# Altium PCB board.PcbDoc
Units mil, origin at the board's own origin, x right, y up, seen from the top; angles counter-clockwise.
Board outline 3543.31 x 2559.06 mil, 4 copper layers (Top Layer, GND, Signal, Bottom Layer), stack 62.337 mil thick; 95 components, 46 nets, 229 pads, 107 vias.
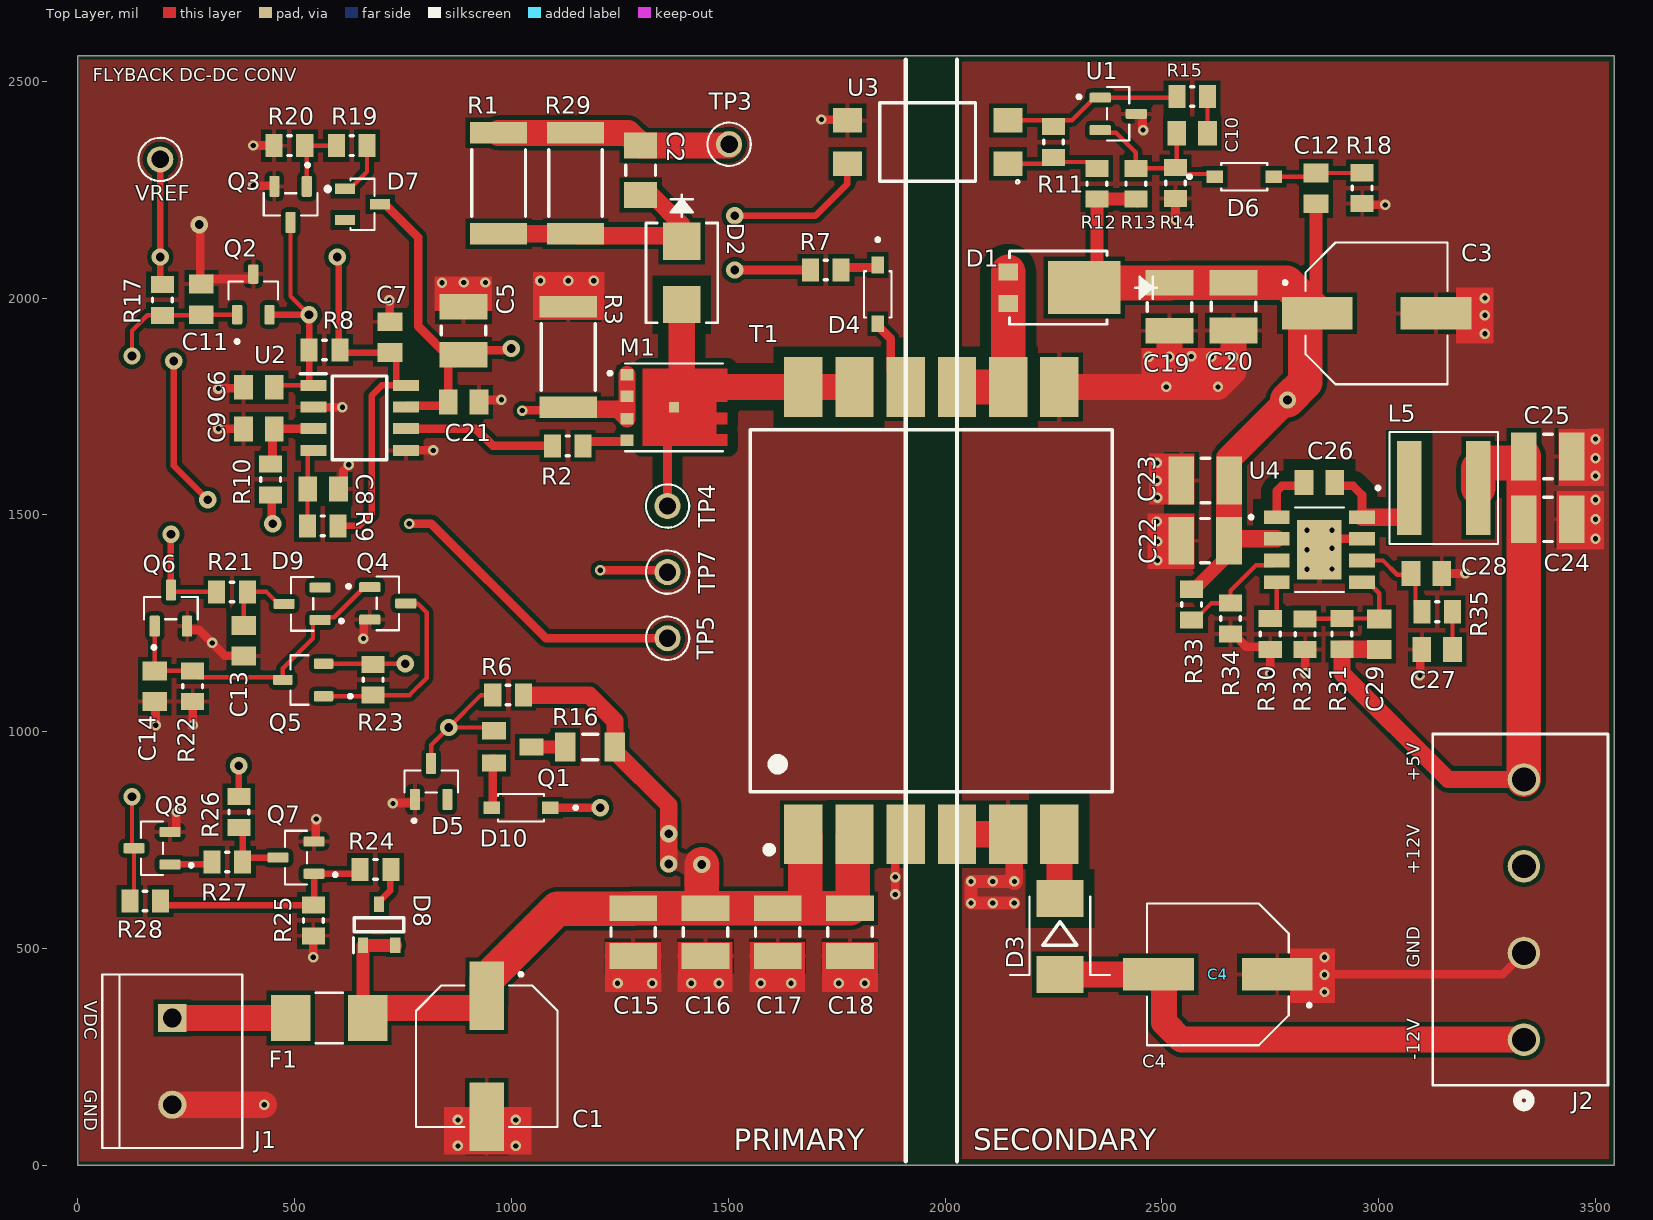
[diagram p0: Top Layer view]
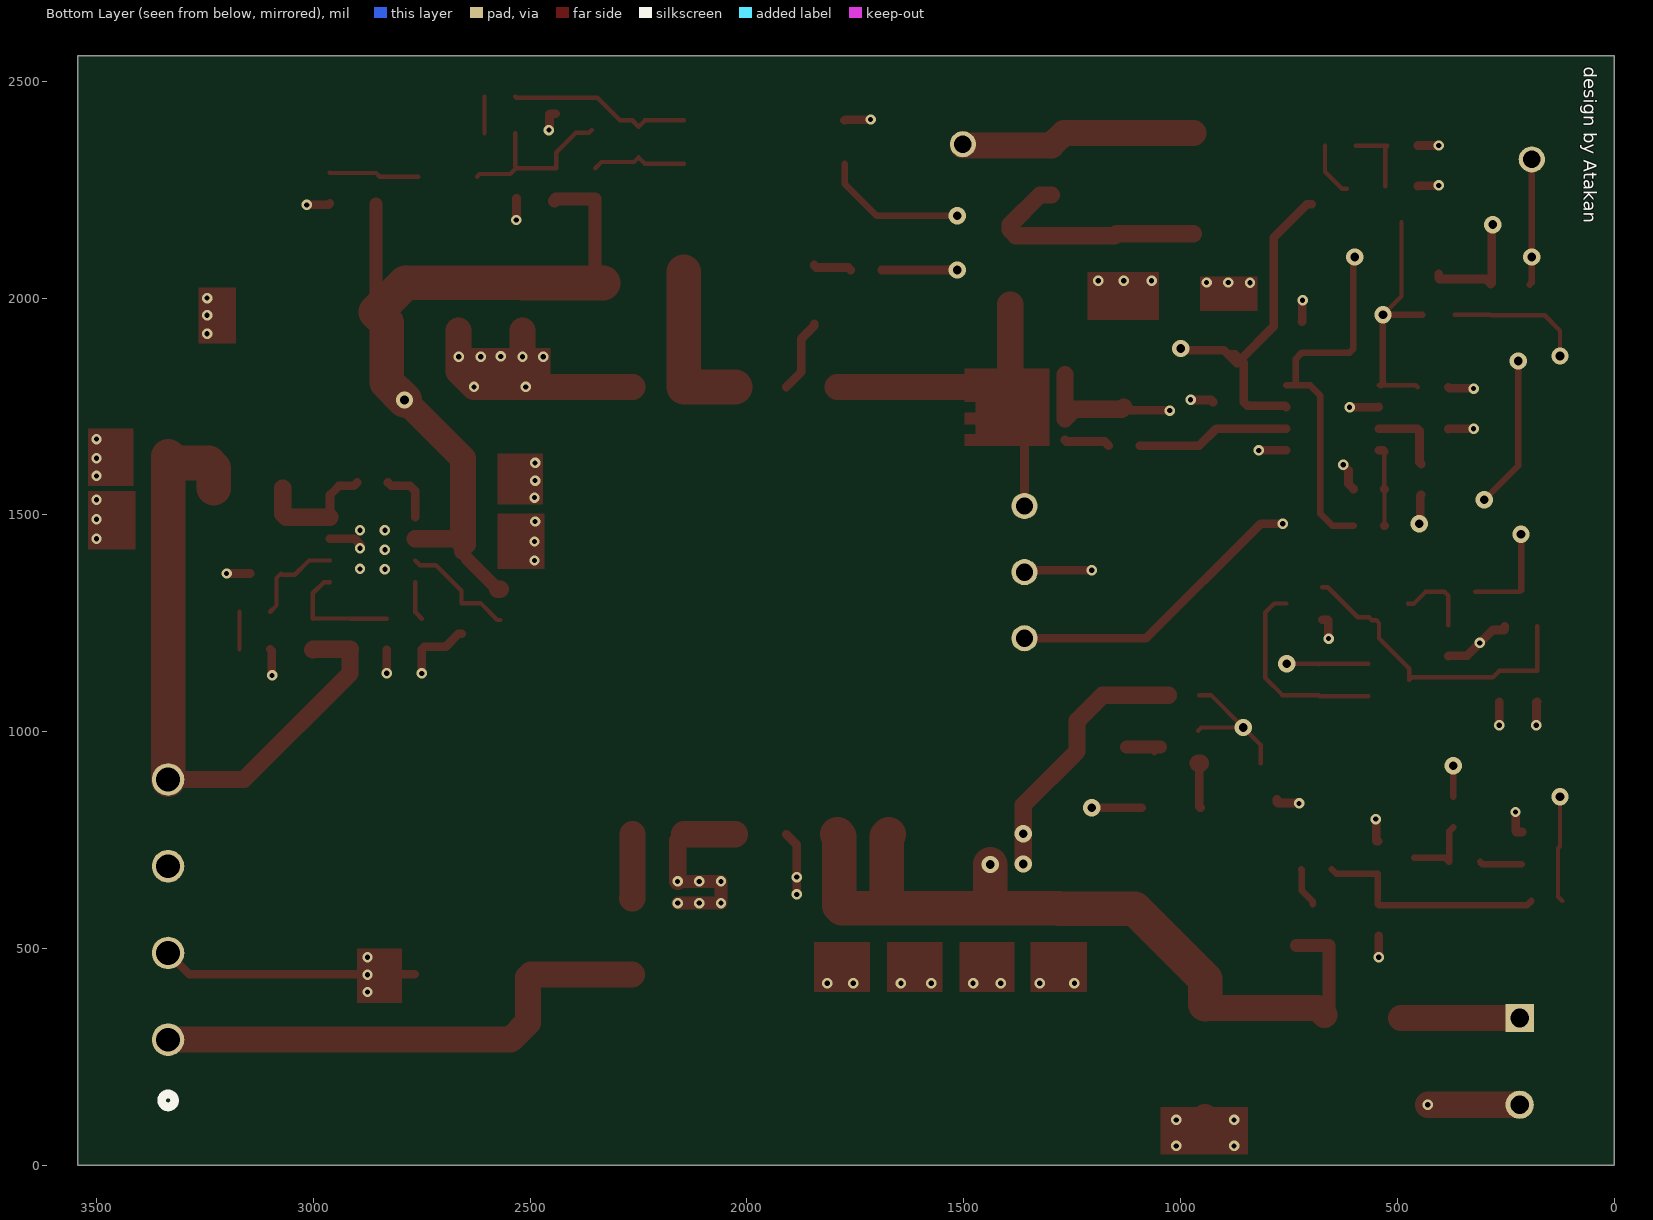
[diagram p1: Bottom Layer view, seen from below]
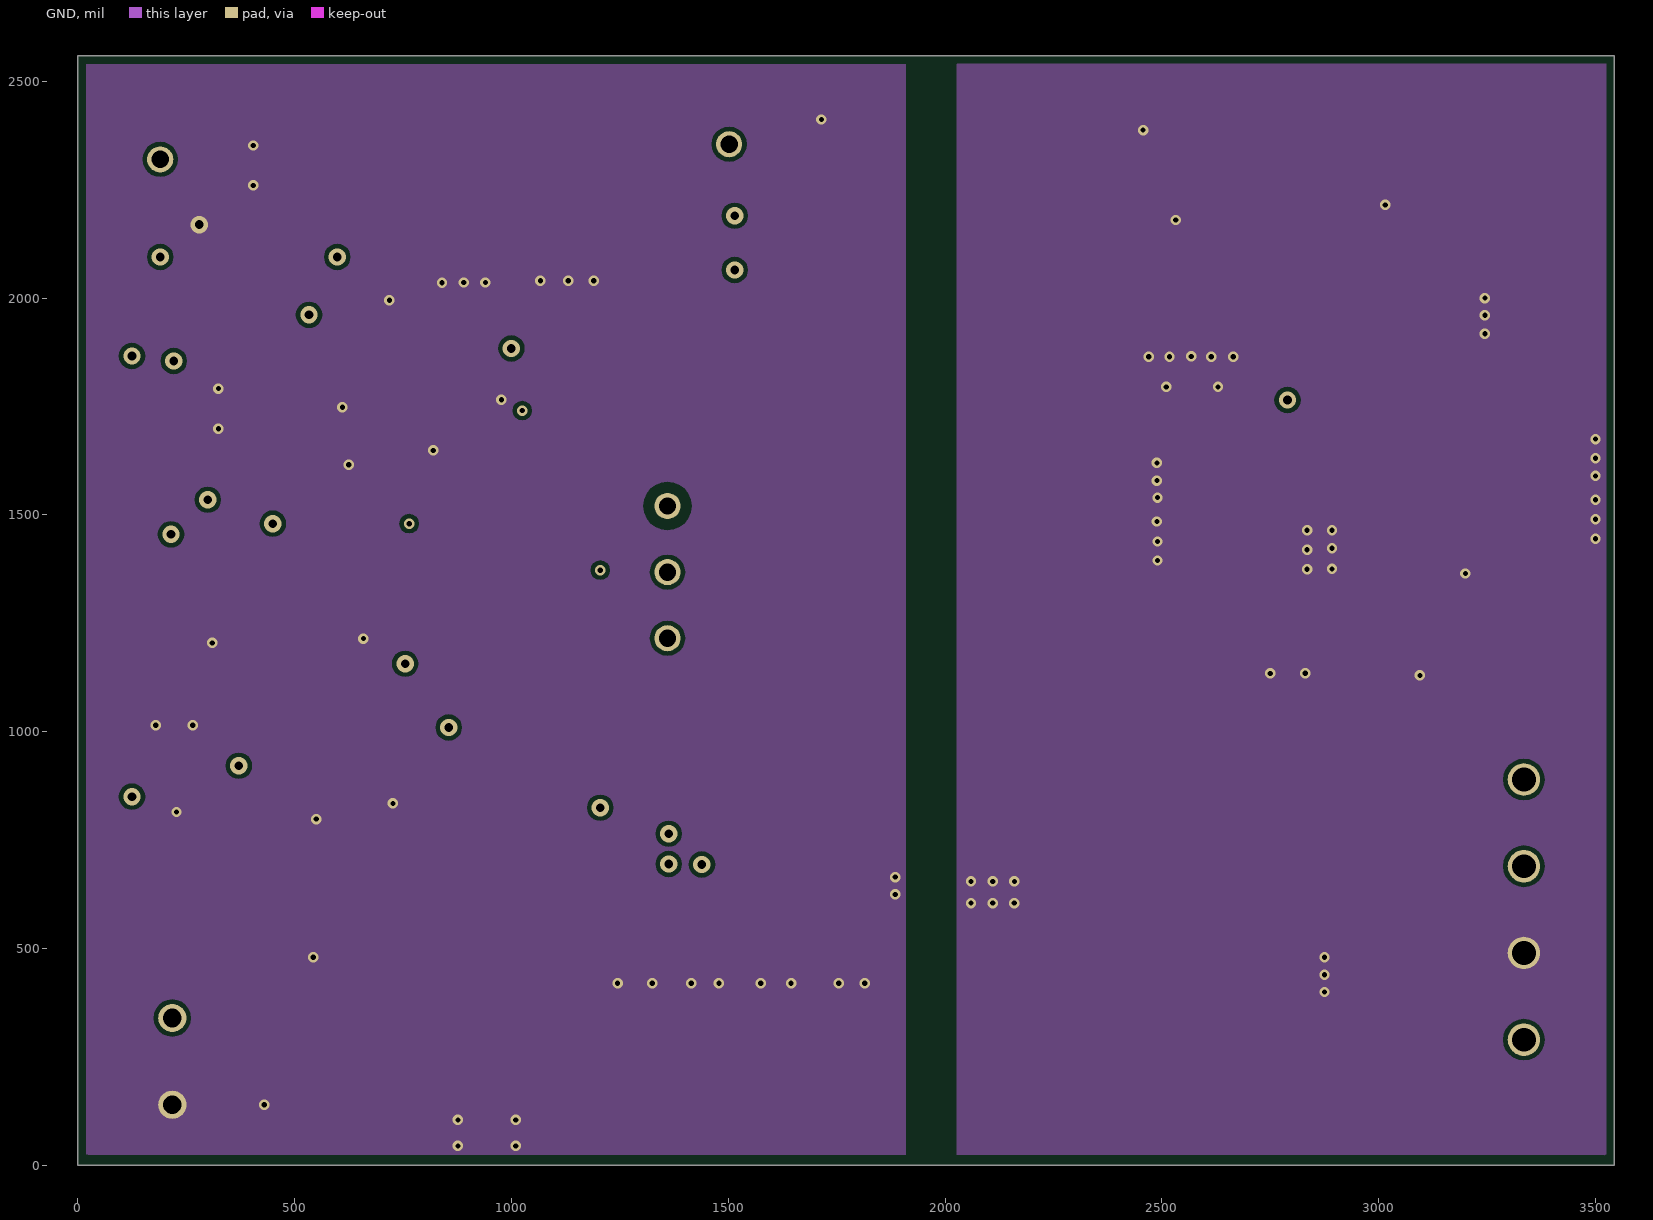
[diagram p2: GND]
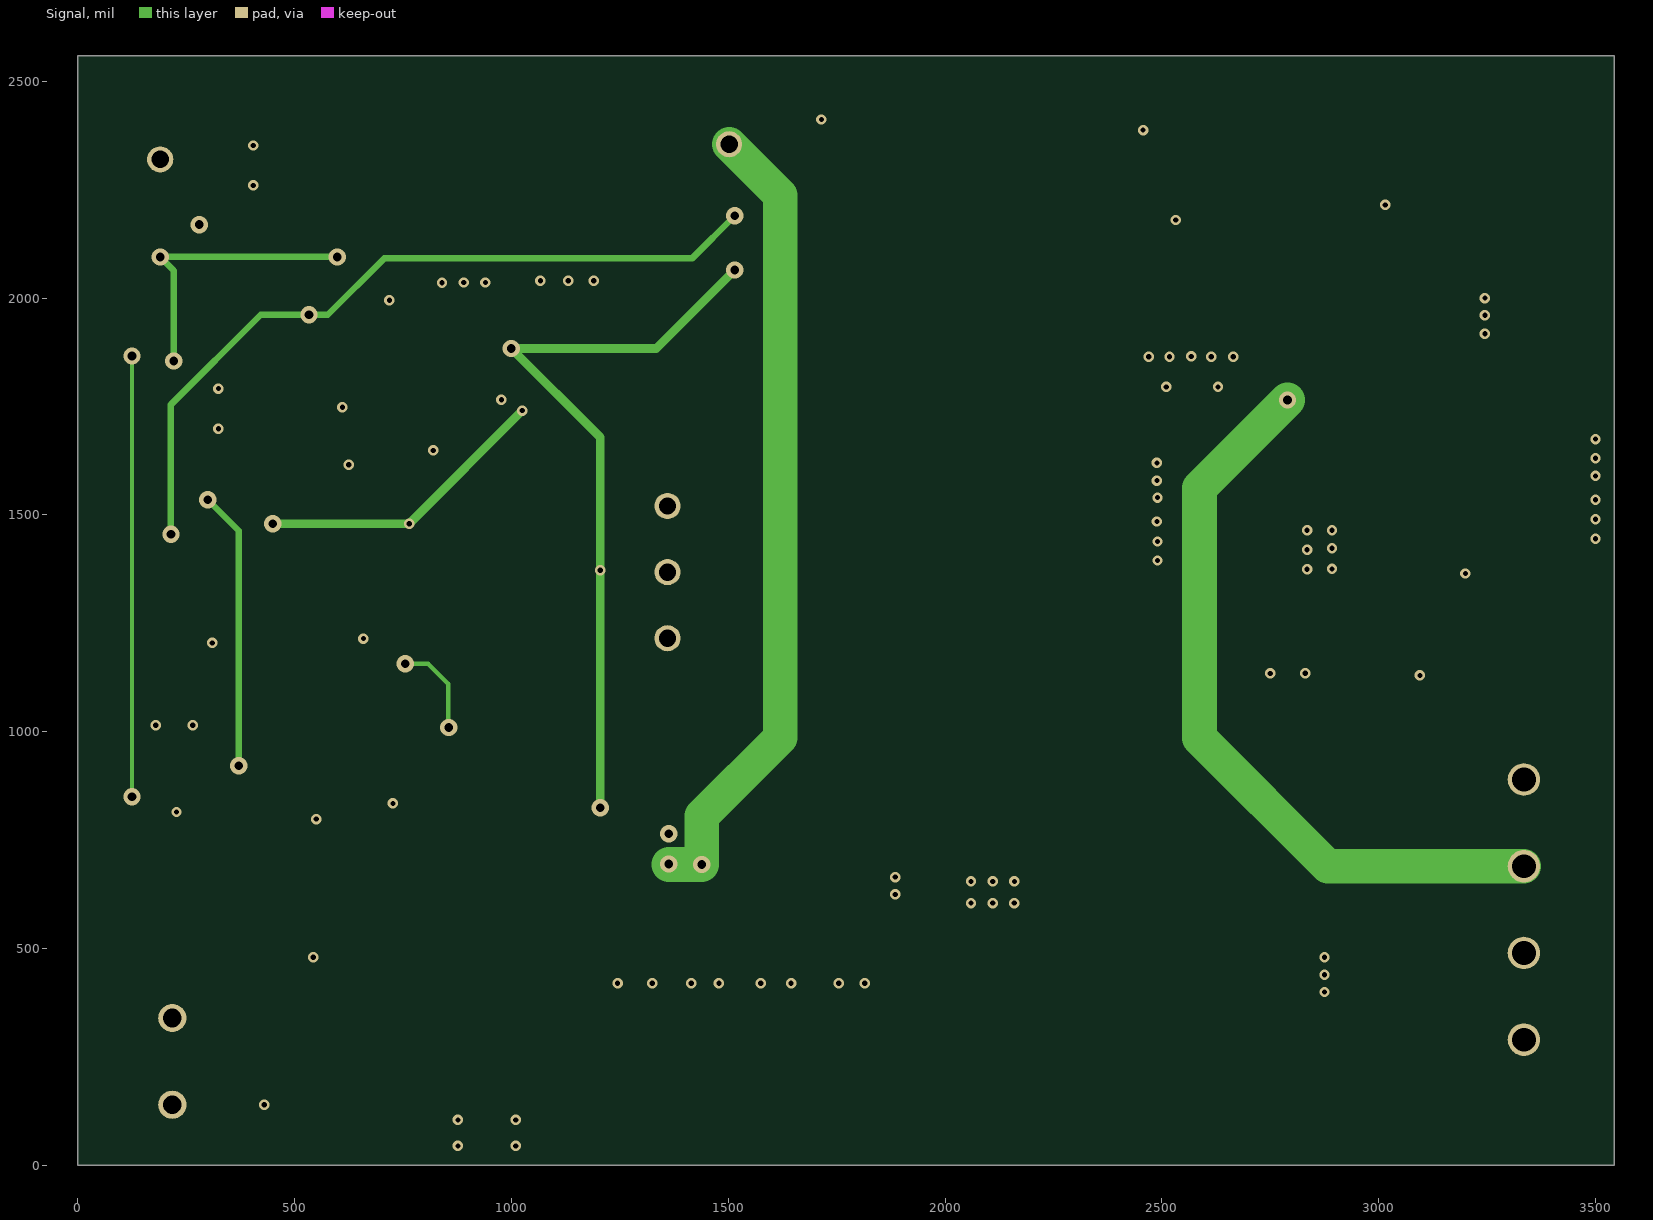
[diagram p3: Signal]
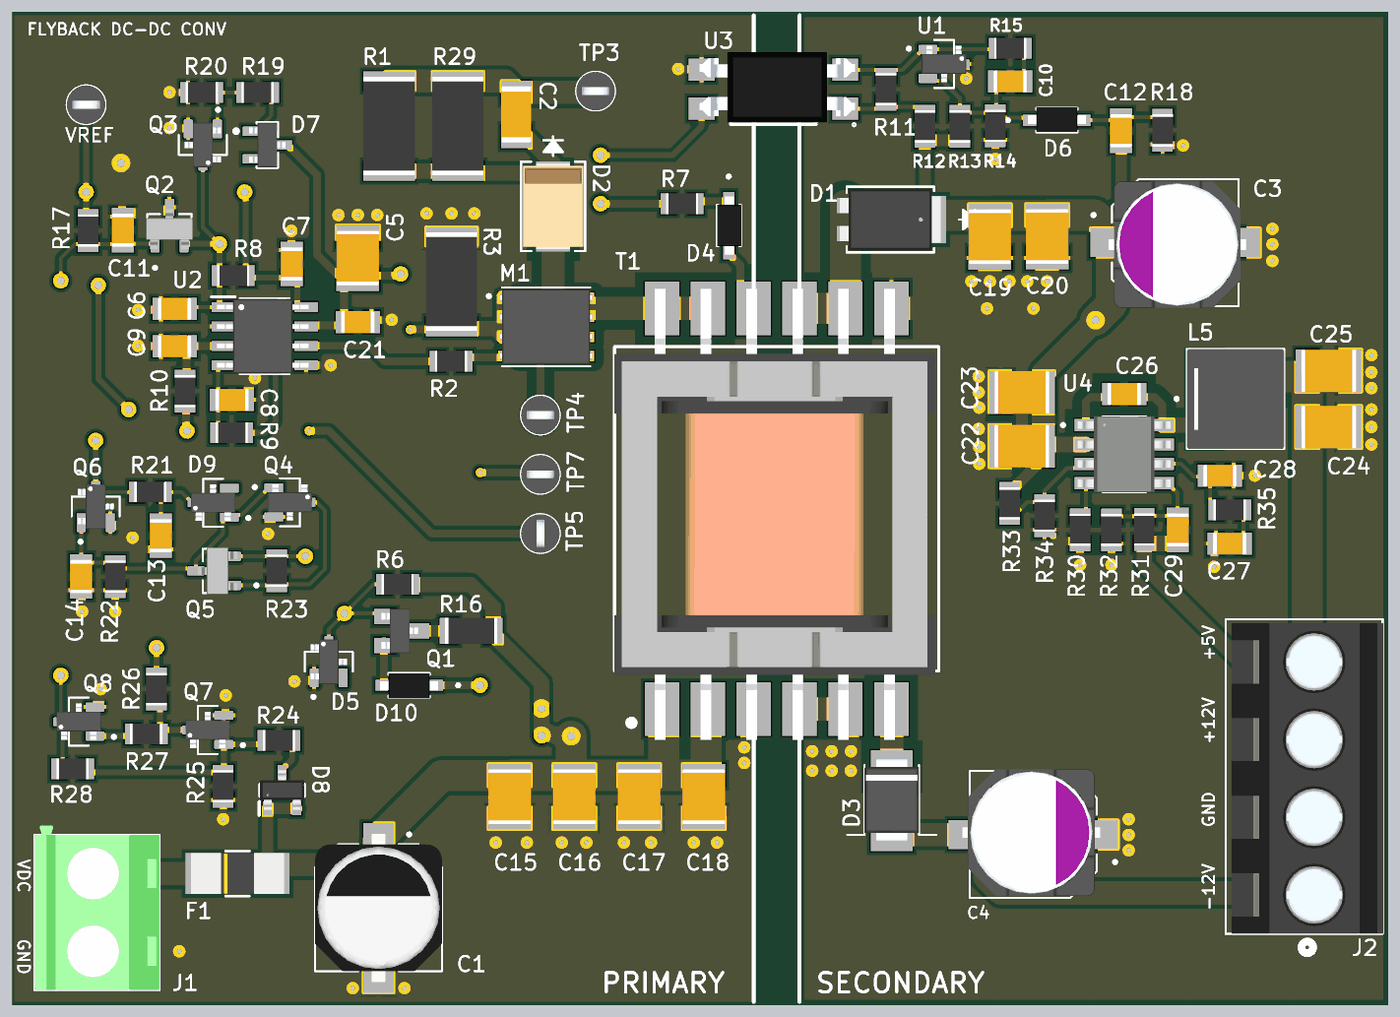
[diagram p4: 3D render of the assembled board from above, using the file's embedded part models]

## Layer stack, top to bottom
Top Solder: solder mask 0.4, Solder Resist, Dk 3.5
Top Layer: signal copper 1.4
Dielectric 2: prepreg 2.8, PP-006, Dk 4.1
GND: signal copper 1.3779
Dielectric 1: dielectric 51.1811, FR-4, Dk 4.8
Signal: signal copper 1.3779
Dielectric 3: prepreg 2.8, PP-006, Dk 4.1
Bottom Layer: signal copper 1.4
Bottom Solder: solder mask 0.4, Solder Resist, Dk 3.5

## Board outline
0,0 0,2559.06 3543.31,2559.06 3543.31,0

## Design rules (kind name [scope] priority, off if disabled: settings)
AssemblyTestPointUsage [All] p1 off:
Clearance Isolation [InNetClass('PRIMARY') vs InNetClass('SECONDARY')] p1: gap=118.11 ignorepadtopadclearanceinfootprint=TRUE
Clearance Poly_SW [InPolygon vs InNet('NetC26_2') Or InNet('NetD1_1') Or InNet('NetD3_C') Or InNet('DRAIN') Or InNet('NetC26_1')] p2: gap=25 ignorepadtopadclearanceinfootprint=FALSE
Clearance [All] p3: gap=10 ignorepadtopadclearanceinfootprint=FALSE
FabricationTestPointUsage [All] p1 off: valid=0 allowmultiple=FALSE
MinimumSolderMaskSliver [All] p1: minsoldermaskwidth=4
PolygonConnect Conn_Direct [InComponent('J2') Or InComponent('J1')] p1: connectstyle=Direct reliefconductorwidth=10 reliefentries=4 polygonreliefangle="90 Angle" airgapwidth=10
PolygonConnect Via_Direct [IsVia] p2: connectstyle=Direct reliefconductorwidth=10 reliefentries=4 polygonreliefangle="90 Angle" airgapwidth=10
PolygonConnect [All] p3: connectstyle=Relief reliefconductorwidth=10 reliefentries=4 polygonreliefangle="90 Angle" airgapwidth=10
RoutingVias [All] p1: holewidth=12 width=24 viastyle="Through Hole" minholewidth=10 minwidth=20 maxholewidth=20 maxwidth=40
SolderMaskExpansion [All] p1: expansion=4
Width Power [InNet('VIN') or InNet('NetF1_1') or InNet('PGND') or InNet('DRAIN') or InNet('CS') or InNet('SGND') or InNet('+12V') or InNet('-12V') or InNet('+5V') or InNet('NetD1_1') or InNet('NetD3_C') or InNet('NetC26_2')] p1: maxlimit=200 minlimit=10 preferedwidth=60
Width [All] p2: maxlimit=50 minlimit=8 preferedwidth=10 toplayer_maxwidth=40 midlayer1_maxwidth=40 midlayer2_maxwidth=40 minimp=50.000000 maximp=50.000000 favimp=50.000000
27 further rules are at their usual default settings.

## Classes and differential pairs
component class sekonder: C10 C12 C22 C23 C24 C25 C26 C27 C28 C29 D6 J2 L5 R11 R12 R13 R14 R15 R18 R30 R31 R32 R33 R34 R35 TP3 TP4 TP5 TP7 U1 U4 VREF
component class primer_kontrol: 33 C5 C6 C7 C9 C11 C21 D4 D5 D10 Q1 Q2 R6 R7 R8 R9 R10 R16 R17 U2 U3
component class primary_koruma: C13 C14 D7 D8 D9 Q3 Q4 Q5 Q6 Q7 Q8 R19 R20 R21 R22 R23 R24 R25 R26 R27 R28
component class giris_guc: C1 C2 C3 C4 C15 C16 C17 C18 C19 C20 D1 D2 D3 F1 J1 M1 R1 R2 R3 R29 T1

## Components (designator, comment, footprint, x,y, rotation, side; value= is the part's Value field where it differs from the comment)
C1 "47uF" CAP_EEHZA1J470P 943.27,251.81 r270 top
C2 "100nF" CAPC3216X180N 1297.91,2295 r90 top
C3 "25SVPF100M" CAP_25SVPF100M 2995,1965 r0 top
C4 "25SVPF100M" CAP_25SVPF100M 2629.29,440.57 r180 top
C5 "22uF" CAPC3225X280N 889.88,1925 r270 top
C6 "2.2nF" CAPC2012X145N 418,1794.47 r0 top
C7 "100nF" CAPC2012X145N 720,1910 r270 top
C8 "620pF" CAPC2012X145N 565.91,1560 r180 top
C9 "220pF" CAPC2012X145N 418,1698.09 r0 top
C10 "10nF" CAPC2012X145N 2570,2380 r0 top
C11 "47nF" CAPC2012X145N 285,1996.97 r270 top
C12 "22nF" CAPC2012X145N 2855.32,2253.03 r270 top
C13 "100nF" CAPC2012X145N 382.76,1209.96 r90 top
C14 "10nF" CAPC2012X145N 177.6,1105 r90 top
C15 "4.7uF" CAPC3225X280N 1280.84,538.07 r90 top
C16 "4.7uF" CAPC3225X280N 1447.51,538.07 r90 top
C17 "4.7uF" CAPC3225X280N 1614.17,538.07 r90 top
C18 "4.7uF" CAPC3225X280N 1780.84,538.07 r90 top
C19 "10uF" CAPC3225X280N 2517.6,1980 r90 top
C20 "10uF" CAPC3225X280N 2664.96,1980.51 r90 top
C21 "100nF" CAPC2012X145N 889.88,1760.43 r180 top
C22 "10uF" CAPC3225X280N 2599.84,1440.67 r0 top
C23 "10uF" CAPC3225X280N 2600.28,1579.25 r0 top
C24 "22uF" CAPC3225X280N 3390,1490 r180 top
C25 "22uF" CAPC3225X280N 3390,1635 r180 top
C26 "100nF" CAPC2012X145N 2863.33,1575 r0 top
C27 "3.3nF" CAPC2012X145N 3135,1190 r0 top
C28 "DNP" CAPC2012X145N 3110,1365 r180 top
C29 "DNP" CAPC2012X145N 3001.12,1225 r270 top
D1 "PDS5100-13" PDS5100_DIO 2261.11,2024.22 r270 top
D2 "MURS120-13-F" SMB_DIO 1392.91,2058.28 r270 top
D3 "MBRS1100T3" SMB 2265,529.57 r270 top
D4 "1N4148W" SODFL3816X120N 1845,2008.78 r270 top
D5 "BZX84C12_RF" SOT95P237X112-3N 815,885.55 r90 top
D6 "1N4148W" SODFL3816X120N 2690,2280 r0 top
D7 "BZX84C13-7-F" SOT91P240X105-3N 656.97,2216.32 r270 top
D8 "MMBZ12VALYT116" SOT95P240X115-3N 695,555 r90 top
D9 "BZX84C3V6RFG" SOT95P237X112-3N 517.4,1295 r180 top
D10 "1N4148W" SODFL3816X120N 1022.01,825 r180 top
F1 "0452 004.MRL" FUS_LITTELFUSE_0452_LTF 580,340 r0 top
J1 "282837-2" TE_282837-2 218.07,240 r270 top
J2 "395443004" CONN_SD-39544-001_NONE_04P_MOL 3334.88,290 r90 top
L5 "XAL6060-562MEC" IND_XAL6060-562MEC 3150,1562.32 r0 top
M1 "CSD19534Q5A" TRANS_CSD19534Q5A 1375,1748.23 r0 top
Q1 "MMBTA06LT3G" SOT-23 1003.03,965 r270 top
Q2 "MMBT3906" SOT95P260X140-3N 405,2008.78 r0 top
Q3 "MMBT3904_RFG" SOT95P237X112-3N 490.77,2216.32 r270 top
Q4 "MMBT3904_RFG" SOT95P237X112-3N 715,1296.06 r0 top
Q5 "MMBT3906" SOT95P260X140-3N 520,1119.57 r90 top
Q6 "MMBT3904_RFG" SOT95P237X112-3N 215,1285.24 r90 top
Q7 "MMBT3904_RFG" SOT95P237X112-3N 503.35,710 r180 top
Q8 "MMBT3904_RFG" SOT95P237X112-3N 171.3,731.42 r180 top
R1 "1.1k" RESC6432X65N 970.55,2265 r90 top
R2 "10" RESC2012X60N 1130,1659.45 r0 top
R3 "0.11" RESC6432X65N 1131.34,1864.37 r270 top
R6 "15k" RESC2012X60N 992.48,1084.57 r0 top
R7 "22" RESC2012X60N 1725,2065 r0 top
R8 "4.7k" RESC2012X60N 568.94,1880.23 r0 top
R9 "13k" RESC2012X60N 565,1475 r0 top
R10 "1k" RESC2012X60N 445,1582 r270 top
R11 "1k" RESC2012X60N 2250,2360 r270 top
R12 "1k" RESC2012X60N 2350,2263.9 r270 top
R13 "38.3k" RESC2012X60N 2440,2263.9 r270 top
R14 "10k" RESC2012X60N 2531.38,2265.43 r90 top
R15 "2.7k" RESC2012X60N 2570,2465 r180 top
R16 "470" RESC3216X65N 1181.71,965 r0 top
R17 "47k" RESC2012X60N 195,1995.87 r90 top
R18 "100k" RESC2012X60N 2961.99,2253.74 r90 top
R19 "1k" RESC2012X60N 631.77,2351.61 r0 top
R20 "10k" RESC2012X60N 488.15,2351.61 r0 top
R21 "10k" RESC2012X60N 355.76,1322.64 r180 top
R22 "4.7k" RESC2012X60N 265.2,1105 r90 top
R23 "10k" RESC2012X60N 681.34,1120 r90 top
R24 "51k" RESC2012X60N 686.65,682.95 r0 top
R25 "10k" RESC2012X60N 543.27,565 r270 top
R26 "10k" RESC2012X60N 371.54,815 r270 top
R27 "10k" RESC2012X60N 345,700 r180 top
R28 "220k" RESC2012X60N 155.51,610 r180 top
R29 "1.1k" RESC6432X65N 1147.91,2265 r90 top
R30 "200k" RESC2012X60N 2750,1225.43 r90 top
R31 "105k" RESC2012X60N 2915,1225.87 r270 top
R32 "20k" RESC2012X60N 2830.51,1225 r270 top
R33 "59k" RESC2012X60N 2568.78,1293.31 r90 top
R34 "7.87k" RESC2012X60N 2658.35,1261.3 r90 top
R35 "14k" RESC2012X60N 3135,1276.85 r0 top
T1 "WE-FLEX_EFD20" WE-FLEX_EFD20 1968.5,1279.53 r90 top
TP3 "5001" KEYSTONE_5001 1502.13,2355 r0 top
TP4 "5001" KEYSTONE_5001 1360,1520.66 r180 top
TP5 "5001" KEYSTONE_5001 1360,1215.71 r270 top
TP7 "5001" KEYSTONE_5001 1360,1368.18 r0 top
U1 "TL431BQDBZR" SOT95P237X112-3N 2399.42,2425 r0 top
U2 "UCC28C43QDRQ1" SOIC127P600X175-8N 650,1723.98 r0 top
U3 "SFH617A-3X017T" *SOIC254P1016X360-4N 1960,2360 r180 top
U4 "AP64350QSP-13" IC_AP64350QSP-13 2863.33,1420 r0 top
VREF "5001" KEYSTONE_5001 190.2,2320 r0 top (schematic designator TP6)

## Footprints (in the part's own frame and the unit in brackets; to place one, negate y for a bottom-side part, rotate by r counter-clockwise, add the part's x,y. Pads: shape width x height; smd on the part's side, far side on the other; paste and mask are expansions set on the pad)
*SOIC254P1016X360-4N [mm]
  rect 1.7x1.45 smd: 1(-4.7,1.27) 2(-4.7,-1.27) 3(4.7,-1.27) 4(4.7,1.27)
  silkscreen extent -5.37,-2.29 2.8,2.43, body extent -5.33,-2.43 4.83,2.17, height 3.81
CAP_25SVPF100M [mm]
  rect 4.15x1.9 smd: 1(-3.475,0) 2(3.475,0)
  silkscreen extent -5.45,-4.15 4.15,4.15, body extent -4.37,-4.28 4.63,4.02, height 6.75
CAP_EEHZA1J470P [mm]
  rect 4x2 smd: 1(-3.55,0) 2(3.55,0)
  silkscreen extent -4.9,-4.15 4.15,4.15, body extent -4.85,-4.15 4.85,4.15, height 10.2
CAPC2012X145N [mm] "C-0805 Cap"
  rect 1.1x1.45 smd: 1(-0.9,0) 2(0.9,0)
  body extent -1.1,-0.72 1.1,0.72, height 1.45
CAPC3216X180N [mm] "C-1206 Cap"
  rect 1.5x1.95 smd: 1(-1.45,0) 2(1.45,0)
  silkscreen extent -0.3,-0.87 0.3,0.87, body extent -1.85,-0.97 1.85,0.97, height 1.8
CAPC3225X280N [mm] "C-1210 Cap"
  rect 1.5x2.8 smd: 1(-1.4,0) 2(1.4,0)
  silkscreen extent -0.25,-1.3 0.25,1.3, body extent -1.8,-1.4 1.8,1.4, height 2.8
CONN_SD-39544-001_NONE_04P_MOL [mil]
  round 75 hole 55 mask+4.02: 1(0,0) 2(200,0) 3(400,0) 4(600,0)
  silkscreen extent -155,-194 705,210, body extent -105,-195 695,195, height 570
FUS_LITTELFUSE_0452_LTF [mil]
  rect 91x106 smd paste+0 mask+0: 1(-88.5,0) 2(88.5,0)
  silkscreen extent -31,-58 31,58, body extent -120,-53 120,53, height 106
IC_AP64350QSP-13 [mm]
  rect 1.505x0.802 smd paste+0 mask+0.102: 1(-2.498,1.905) 2(-2.498,0.635) 3(-2.498,-0.635) 4(-2.498,-1.905) 5(2.498,-1.905) 6(2.498,-0.635) 7(2.498,0.635) 8(2.498,1.905)
  rect 2.613x3.502 smd paste-3 mask+0.102: 9(0,0)
  silkscreen extent -4.1,-2.47 1.43,2.47, body extent -3.05,-2.48 3.05,2.48, height 1.63
IND_XAL6060-562MEC [mm]
  rect 1.43x5.5 smd paste+0 mask+0.102: 1(-2.02,0) 2(2.02,0)
  silkscreen extent -3.95,-3.28 3.18,3.28, body extent -3.18,-3.28 3.18,3.28, height 6.1
KEYSTONE_5001 [mm]
  round 1.53 hole 1.02: TP(0,0)
  silkscreen extent -1.27,-1.27 1.27,1.27, body extent -1.27,-1.27 1.27,1.27, height 4.57
PDS5100_DIO [mil]
  rect 39x44.87 smd paste+0 mask+0: 1(-36.22,-115.44) 2(36.22,-115.44)
  rect 121.97x167.56 smd paste+0 mask+0: 3(0,60)
  silkscreen extent -85,-113 85,228, body extent -79,-130 79,130, height 47
RESC2012X60N [mm] "R-0805 Res"
  rect 1x1.35 smd: 1(-0.9,0) 2(0.9,0)
  silkscreen extent -0.1,-0.58 0.1,0.58, body extent -1.05,-0.67 1.05,0.67, height 0.6
RESC3216X65N [mm] "R-1206 Res"
  rect 1.2x1.7 smd: 1(-1.45,0) 2(1.45,0)
  silkscreen extent -0.45,-0.75 0.45,0.75, body extent -1.7,-0.85 1.7,0.85, height 0.65
RESC6432X65N [mm] "R-2512 Res"
  rect 1.25x3.35 smd: 1(-2.95,0) 2(2.95,0)
  silkscreen extent -1.95,-1.58 1.95,1.58, body extent -3.22,-1.68 3.22,1.68, height 0.65
SMB [mil]
  rect 85x108 smd paste+0 mask+4.02: A(89,0) C(-86,0)
  silkscreen extent -90,-115 90,115, body extent -107,-70 107,70, height 96
SMB_DIO [mm]
  rect 2.18x2.21 smd paste+0 mask+0: 1(-1.857,0) 2(1.857,0)
  silkscreen extent -4.57,-2.1 2.92,2.1, body extent -2.8,-1.97 2.8,1.97, height 2.45
SODFL3816X120N [mm]
  rect 0.97x0.73 smd paste+0 mask+0.102: A(1.72,0) C(-1.72,0)
  silkscreen extent -3.3,-0.8 1.35,0.8, body extent -1.9,-0.76 1.9,0.84, height 0.97
SOIC127P600X175-8N [mm]
  rect 1.528x0.65 smd: 1(-2.711,1.905) 2(-2.711,0.635) 3(-2.711,-0.635) 4(-2.711,-1.905) 5(2.711,-1.905) 6(2.711,-0.635) 7(2.711,0.635) 8(2.711,1.905)
  silkscreen extent -3.47,-2.45 1.6,2.58, body extent -3.12,-2.45 2.87,2.45, height 1.75
SOT91P240X105-3N [mm]
  rect 0.61x1.18 smd paste+0 mask+0.102: 1(-0.915,-1.025) 2(0.915,-1.025) 3(0,1.025)
  silkscreen extent -1.5,-2.1 1.5,0.7, body extent -1.45,-1.2 1.45,1.2, height 1.14
SOT95P237X112-3N [mm]
  rrect25% 1.24x0.59 smd paste+0 mask+0.102: 1(-1.055,0.95) 2(-1.055,-0.95) 3(1.055,0)
  silkscreen extent -2.4,-1.57 0.65,1.57, body extent -1.18,-1.46 1.18,1.46, height 1.12
SOT95P240X115-3N [mm]
  rect 0.9x0.6 smd: 1(-1.2,0.95) 2(-1.2,-0.95) 3(1.2,0)
  silkscreen extent -1.65,-1.45 0.4,1.5, body extent -1.29,-1.45 1.3,1.45, height 1.15
SOT95P260X140-3N [mm]
  rrect25% 0.6x1.14 smd paste+0 mask+0.102: 1(-0.95,-1.19) 2(0.95,-1.19) 3(0,1.19)
  silkscreen extent -1.45,-2.86 1.45,0.75, body extent -1.52,-1.52 1.52,1.08, height 1.28
SOT-23 [mm]
  rect 1x1.4 smd paste+0 mask+0.102: BASE(-0.95,-1.1) COLLECTOR(0,1.1) EMITTER(0.95,-1.1)
  body extent -1.45,-1.33 1.45,1.07, height 1.11
TE_282837-2 [mm]
  rect 1.65x1.65 / inner round 1.65 / far side rect 1.65x1.65 hole 1.1: 1(-2.54,0)
  round 1.65 hole 1.1: 2(2.54,0)
  silkscreen extent -5.08,-4.1 5.08,4.1, body extent -5.68,-4.1 5.08,4.1, height 10
TRANS_CSD19534Q5A [mm]
  rect 0.75x0.675 smd paste-1: 1(-2.752,1.917) 2(-2.752,0.66) 3(-2.752,-0.66) 4(-2.752,-1.917)
  rect 0.6x0.6 smd paste-1 mask+0: 5(0,0)
  Top Layer region: 3.127,1.58 2.472,1.58 2.472,0.998 3.127,0.998 3.127,0.323 2.472,0.323 2.472,-0.323 3.127,-0.323 3.127,-0.998 2.472,-0.998 2.472,-1.58 3.127,-1.58 3.127,-2.255 -1.823,-2.255 -1.823,2.255 3.127,2.255
  silkscreen extent -3.85,-2.58 2.88,2.58, body extent -3,-2.45 3,2.45, height 1.1
WE-FLEX_EFD20 [mm]
  rect 3.5x2.25 smd paste+0 mask+0.102: 1(-13.1,7.5) 2(-13.1,4.5) 3(-13.1,1.5) 4(-13.1,-1.5) 5(-13.1,-4.5) 6(-13.1,-7.5) 7(13.1,-7.5) 8(13.1,-4.5) 9(13.1,-1.5) 10(13.1,1.5) 11(13.1,4.5) 12(13.1,7.5)
  silkscreen extent -14.2,-10.6 10.6,10.6, body extent -15.11,-10.37 14.39,10.63, height 10.8

## Part data
C1: library part EEHZA1J470P, "EEHZA1J470P  / 47F 63V Aluminum - Polymer Capacitors Radial, Can - SMD 40mOhm 10000 Hrs @ 105C", Package="RADIAL-2 Panasonic", Availability="In Stock", Check_prices=https://www.snapeda.com/parts/EEHZA1J470P/Panasonic/view-part/?ref=eda, MF=Panasonic, MP=EEHZA1J470P, Price=None, Purchase-URL=https://pricing.snapeda.com/search?q=EEHZA1J470P&ref=eda, SnapEDA_Link=https://www.snapeda.com/parts/EEHZA1J470P/Panasonic/view-part/?ref=snap
C2: library part C_1206, "100nF, 100V, X7R"
C3 C4: "CAP, ALU ELEC, POLYMER, 100UF, 25V, SMD; Capacitance: 100µF; Voltage(DC): 25V; Capacitor Case / Package: Radial Can - SMD; ESR: 0.024ohm; Lifetime @ Temperature: 5000 hours", Package=None, Check_prices=https://www.snapeda.com/parts/25SVPF100M./Panasonic/view-part/?ref=eda, MF=Panasonic, MP=25SVPF100M., SnapEDA_Link=https://www.snapeda.com/parts/25SVPF100M./Panasonic/view-part/?ref=snap
C5: library part C_1210, "22µF, 25V, X7R"
C6 C7 C8 C9 C10 C11 C12 C13 C14 C21 C26 C27 C28 C29: library part C_0805
C15 C16 C17 C18: library part C_1210, "Murata GRM32ER72A475KE14L / 4.7µF, 100V, X7R"
C19 C20: library part C_1210, "10µF, 25V"
C22 C23 C24 C25: library part C_1210
D1: "100V, 5A Schottky, AEC-Q101", Manufacturer_Name="Diodes Inc", Copyright="Copyright (C) 2026 Ultra Librarian. All rights reserved.", Manufacturer_Part_Number=PDS5100-13, RefDes=RefDes, Type=Type
D2: "200V, 1A, ultra hýzl", Manufacturer_Name="Diodes Inc", Copyright="Copyright (C) 2025 Ultra Librarian. All rights reserved.", Manufacturer_Part_Number=MURS120-13-F
D3: "1.0 A, 100 V, Schottky Power Rectifier, Surface Mount", MANUFACTURER="ON Semiconductor", Package="SMB-2 ON Semiconductor", DATASHEET_URL=https://www.onsemi.com/pub/Collateral/MBRS1100T3-D.PDF, MPN=MBRS1100T3, SOURCE_URL=https://www.snapeda.com/parts/MBRS1100T3/Onsemi/view-part/
D4 D6 D10: "Small Signal Diode, SOD-123F, 100V, 0.15A, 150°C", Package="SOD-123F Diotec", Check_prices=https://www.snapeda.com/parts/1N4148W/Diotec/view-part/?ref=eda, MF="Diotec Semiconductor", MP=1N4148W, SnapEDA_Link=https://www.snapeda.com/parts/1N4148W/Diotec/view-part/?ref=snap
D5 TP3 TP4 TP5 TP7 U1 VREF: Package=None, Availability=Unavailable, Price=None
  D5: MF="{'manufacturer': u'Taiwan Semiconductor'}", MP="BZX84C12 RFG"
  TP3 TP4 TP5 TP7 VREF: MF="Keystone Electronics", MP=5001
  U1: MP=TL431BQDBZR
D7: "Zener Diode 13 V 300 mW ±6.54% Surface Mount SOT-23-3", Package="SOT-23 Diodes Inc.", Check_prices=https://www.snapeda.com/parts/BZX84C13-7-F/Diodes+Inc./view-part/?ref=eda, MF="Diodes Inc.", MP=BZX84C13-7-F, SnapEDA_Link=https://www.snapeda.com/parts/BZX84C13-7-F/Diodes+Inc./view-part/?ref=snap
D8: "8.5V, SOT-23, Dual Line, Anode Common Transient Voltage Suppressor", Manufacturer_Name="ROHM Semiconductor", Mouser Part Number=755-MMBZ12VALYT116, Datasheet Link=https://fscdn.rohm.com/en/products/databook/datasheet/discrete/diode/zener/mmbz12valyt116-e.pdf, Geometry.Height=1.15mm, Manufacturer_Part_Number=MMBZ12VALYT116, Mouser Price/Stock=https://www.mouser.co.uk/ProductDetail/ROHM-Semiconductor/MMBZ12VALYT116?qs=QNEnbhJQKvYQxyBM5QcKxw%3D%3D
D9: "Diode Zener Single 3.6V 5% 0.3W 3-Pin SOT-23 Plastic T/R", Package="SOT-23 Taiwan Semiconductor", Check_prices=https://www.snapeda.com/parts/BZX84C3V6RFG/taiwan/view-part/?ref=eda, MF="Taiwan Semiconductor", MP=BZX84C3V6RFG, SnapEDA_Link=https://www.snapeda.com/parts/BZX84C3V6RFG/taiwan/view-part/?ref=snap
F1: library part "0452 003.MRL", "Littelfuse 0452004.MRL", Manufacturer_Name="Littelfuse Inc", Copyright="Copyright (C) 2025 Ultra Librarian. All rights reserved.", Manufacturer_Part_Number="0452 003.MRL"
J1: "Terminal Block Connector Wire Receptacle 2 5.08 mm 30-16 AWG Green 13.5 A 250 V", Package=None, Availability="In Stock", Check_prices=https://www.snapeda.com/parts/282837-2/TE+Connectivity+AMP+Connectors/view-part/?ref=eda, MF="TE Connectivity", MP=282837-2, Price=None, Purchase-URL=https://pricing.snapeda.com/search/part/282837-2/?ref=eda, SnapEDA_Link=https://www.snapeda.com/parts/282837-2/TE+Connectivity+AMP+Connectors/view-part/?ref=snap
J2: "Conn Eurostyle Block 4 POS 5.08mm Solder ST Thru-Hole 15A/Contact Eurostyle™", Package=None, Check_prices=https://www.snapeda.com/parts/395443004/Molex/view-part/?ref=eda, MF=Molex, MP=395443004, SnapEDA_Link=https://www.snapeda.com/parts/395443004/Molex/view-part/?ref=snap
L5: "5.6 µH Shielded Molded Inductor 10 A 15.9mOhm Max Nonstandard", Package=None, Check_prices=https://www.snapeda.com/parts/XAL6060-562MEC/Coilcraft/view-part/?ref=eda, MF=Coilcraft, MP=XAL6060-562MEC, SnapEDA_Link=https://www.snapeda.com/parts/XAL6060-562MEC/Coilcraft/view-part/?ref=snap
M1: "100V, N ch NexFET MOSFET, single SON5x6, 15.1mOhm 8-VSONP -55 to 150", Package="VSONP-8 Texas Instruments", Availability=Good, DigiKey-Purchase-URL=https://snapeda.com/shop?store=DigiKey&id=485742, MF="Texas Instruments", Mouser-Purchase-URL=https://snapeda.com/shop?store=Mouser&id=485742, MP=CSD19534Q5A, Price=None, SnapEDA_Link=https://www.snapeda.com/parts/CSD19534Q5A/Texas%20Instruments/view-part/485742/?ref=snap, Texas_Instruments-Purchase-URL=https://snapeda.com/shop?store=Texas+Instruments&id=485742
Q1: "Bipolar (BJT) Transistor NPN 80 V 500 mA 100MHz 225 mW Surface Mount SOT-23-3 (TO-236)", Package="SOT-23-3 ON Semiconductor", Check_prices=https://www.snapeda.com/parts/MMBTA06LT3G/Onsemi/view-part/?ref=eda, MF="ON Semiconductor", MP=MMBTA06LT3G, SnapEDA_Link=https://www.snapeda.com/parts/MMBTA06LT3G/Onsemi/view-part/?ref=snap
Q2 Q5: "Bipolar (BJT) Transistor PNP 40 V 200 mA 300MHz 200 mW Surface Mount SOT-23", Package=None, Check_prices=https://www.snapeda.com/parts/MMBT3906/MDD/view-part/?ref=eda, MF=MDD, MP=MMBT3906, SnapEDA_Link=https://www.snapeda.com/parts/MMBT3906/MDD/view-part/?ref=snap
Q3 Q4 Q6 Q7 Q8: "SOT-23, 60V, 0.2A, NPN Transistor", Package="SOT-23-3 Taiwan Semiconductor", Check_prices=https://www.snapeda.com/parts/MMBT3904%20RFG/taiwan/view-part/?ref=eda, MF="Taiwan Semiconductor", MP="MMBT3904 RFG", SnapEDA_Link=https://www.snapeda.com/parts/MMBT3904%20RFG/taiwan/view-part/?ref=snap
R1 R29: library part R_2512, "Yageo RC2512FK-071K1L / 1.1k?, 1W"
R2 R6 R7 R8 R9 R10 R11 R12 R13 R14 R15 R17 R18 R19 R20 R21 R22 R23 R24 R25 R26 R27 R28 R30 R31 R32 R33 R34 R35: library part R_0805
R3: library part R_2512, "Yageo PT2512FK-7W0R11L / 0.11?, %1, 2W, AEC-Q200"
R16: library part R_1206, "Panasonic ERJ-P08J471V"
T1: "Flexible For Configurable (For DC/DC) SMPS Transformer 500VDC Isolation Surface Mount", Package=None, Check_prices=https://www.snapeda.com/parts/749196521/W%25C3%25BCrth+Elektronik+Midcom/view-part/?ref=eda, MF="Würth Elektronik", MP=749196521, SnapEDA_Link=https://www.snapeda.com/parts/749196521/W%25C3%25BCrth+Elektronik+Midcom/view-part/?ref=snap
U2: "Automotive BiCMOS Low-Power Current-Mode PWM Controller", Manufacturer_Name="Texas Instruments", Mouser Part Number=595-UCC28C43QDRQ1, Arrow Part Number=UCC28C43QDRQ1, Arrow Price/Stock=https://www.arrow.com/en/products/ucc28c43qdrq1/texas-instruments.html?utm_currency=USD&region=nac, Datasheet Link=http://www.ti.com/lit/gpn/ucc28c43-q1, Geometry.Height=1.75mm, Manufacturer_Part_Number=UCC28C43QDRQ1, Mouser Price/Stock=https://www.mouser.co.uk/ProductDetail/Texas-Instruments/UCC28C43QDRQ1?qs=xhbEVWpZdWdYUtf6Fj0SHg%3D%3D
U3: MANUFACTURER=VISHAY, SOURCE_URL=https://www.snapeda.com/parts/SFH617A-3X017/Vishay/view-part/?ref=snap
U4: "Buck Switching Regulator IC Positive Adjustable 0.8V 1 Output 3.5A 8-SOIC (0.154, 3.90mm Width) Exposed Pad", Package=None, Check_prices=https://www.snapeda.com/parts/AP64350QSP13/Diodes+Inc./view-part/?ref=eda, MF="Diodes Incorporated", MP=AP64350QSP13, SnapEDA_Link=https://www.snapeda.com/parts/AP64350QSP13/Diodes+Inc./view-part/?ref=snap

## Via types
v1: diameter 24, hole 12, Top Layer to Bottom Layer, 86 vias
v2: diameter 40, hole 20, Top Layer to Bottom Layer, 21 vias

## Nets (pads, with @x,y where several pads share a name; then routed paths per layer and width w, separated by ;. In a path a pad name is that pad's centre, name@x,y a point inside that pad or via, vN(x,y) a via of type N, cw(c..) or ccw(c..) an arc to the next point about the centre after c; other vN are vias at no path point)
+5V: C24.2 C25.2 C29.2 J2.4 L5.2 R31.2 | length 1568.6
  Top Layer w40: C29.2 3000.57,1190.12 2921.57,1190.12 2921.26,1190.43 R31.2 2915.31,1190.12 2915.31,1134.69 3160,890 J2.4
  Top Layer w80: L5.2 3229.53,1608.03 3241.38,1619.88 3324.41,1619.88 C25.2@3334.88,1630.35 ; J2.4 C24.2 C25.2@3334.88,1630.35 ; C25.2 C25.2@3334.88,1630.35
+12V: C3.1 C12.2 C19.2 C20.2 C22.2 C23.2 D1.3 J2.3 R12.2 R13.2 R33.2 U4.2 | length 3733.8
  Top Layer w30: D1.3 2332,2035.12 2350,2053.11 R12.2 R13.2 R13.2@2443.86,2224.61 ; R33.2@2575.04,1328.74 C22.2@2645.43,1399.13 ; C3.1@2855.32,1967.87 C12.2
  Top Layer w40: R33.2 R33.2@2575.04,1328.74 ; C22.2@2645.43,1431.14 C22.2 C22.2@2655.18,1440.89 ; C22.2@2655.12,1416.42 2655.33,1416.63 2655.33,1435.85 2664.49,1445 U4.2 ; C23.2@2655.33,1554.78 C23.2@2655.55,1555
  Top Layer w60: C22.2@2655.18,1440.89 C23.2@2655.18,1603.68 ; C23.2 2655.39,1630.71 v2(2789.68,1765)
  Top Layer w80: D1.3@2332,2035.12 C19.2 2517.85,2035.37 2664.7,2035.37 C20.2 2787.56,2035.63 2855.32,1967.87 2830.51,1943.07 2830.51,1805.83 v2(2789.68,1765)
  Signal w80: v2(2789.68,1765) 2586.84,1562.16 2586.84,985.91 2882.76,690 J2.3
-12V: C4.2 D3.A J2.1 | length 1192.7
  Top Layer w60: D3.A C4.2 2497.6,440.57 2505,433.17 2505,330 2545,290 J2.1
AUX_V: D4.A T1.10 | length 172.5
  Top Layer w20: D4.A 1845,1936.34 1875.16,1906.18 1875.16,1829.57 T1.10
COMP: C6.2 Q2.2 Q3.3 Q6.3 R8.1 R21.2 U2.1 U3.4 | length 2937.4
  Top Layer w10: Q6.3 219.13,1322.64 R21.2 ; C6.2 457.94,1798.98 538.8,1798.98 U2.1 ; Q3.3 490.77,2004.23 v2(533.5,1961.5)
  Top Layer w15: v2@208.24,1455.32 v2(215,1455.32) Q6.3 ; Q2.2 442.62,1961.71 533.29,1961.71 v2(533.5,1961.5) R8.1 533.5,1804.27 U2.1@538.8,1798.98 ; v2(1515,2190) 1701.06,2190 1774.96,2263.9 U3.4
  Signal w15: v2(215,1455.32) 215,1754.7 421.79,1961.5 v2(533.5,1961.5) 576.5,1961.5 706.57,2091.57 1416.57,2091.57 v2(1515,2190)
COMP5: C28.2 R35.1 U4.6 | length 226.4
  Top Layer w10: U4.6 3010,1395 3043.07,1361.93 3071.5,1361.93 C28.2 3084.88,1354.69 3084.88,1291.54 R35.1
CS: M1.1 M1.2 M1.3 R3.2 R10.2 TP5.TP | length 1813.8
  Top Layer w20: R10.2 447.5,1544.07 447.5,1482.5 v2(450,1480) ; v1(764.29,1480) 815.39,1480 1079.68,1215.71 TP5.TP ; v1(1025.04,1740.75) 1025.8,1741.51 1124.62,1741.51 R3.2
  Top Layer w40: R3.2 1135.94,1743.62 1245.26,1743.62 M1.3 M1.2 M1.1
  Signal w20: v2(450,1480) v1(764.29,1480) v1(1025.04,1740.75)
CZ5: C27.2 R35.2 | length 86.9
  Top Layer w10: C27.2 R35.2
DRAIN: D2.2 M1.5 T1.11 T1.12 TP4.TP | length 888.6
  Top Layer w20: TP4.TP 1360,1733.23
  Top Layer w60: 1360,1733.23 M1.5 1392.91,1766.14 ; D2.2 1392.91,1766.14 ; T1.11 T1.12 1422.05,1795.28 1392.91,1766.14
EN5: R33.1 R34.2 U4.3 | length 269.9
  Top Layer w10: R33.1 2575.67,1257.87 2614.53,1296.73 R34.2 2658.35,1325.51 2717.05,1384.21 2754.21,1384.21 U4.3
FB5: C29.1 R31.1 R32.1 U4.5 | length 280.3
  Top Layer w10: R32.1 2914.13,1260.43 R31.1 3000.26,1261.3 C29.1 3001.12,1319.37 2975.49,1345 U4.5
FBREF: C10.1 D6.C R13.1 R14.2 U1.2 | length 412.3
  Top Layer w10: U1.2 2364.34,2381.14 2395,2381.14 2440,2336.14 R13.1 2529.84,2299.33 R14.2 ; C10.1 2534.57,2304.06 R14.2 ; D6.C 2616.1,2286.18 2546.06,2286.18 R14.2
GATE: R2.1 U2.6 | length 354.2
  Top Layer w20: U2.6 917.97,1698.98 957.5,1659.45 R2.1
ISENSE: C9.2 R10.1 U2.3 | length 174.4
  Top Layer w20: R10.1 449.22,1621.65 449.22,1693.87 C9.2 453.88,1698.53 542.82,1698.53 U2.3
KAT: R11.1 R15.2 U1.1 U3.2 | length 424.4
  Top Layer w10: U3.2 2235.43,2410 R11.1 2264.69,2410.12 2292.81,2410.12 2345.09,2462.4 U1.1 2531.97,2462.4 R15.2
LED_A: R11.2 R12.1 U3.1 | length 221.4
  Top Layer w10: U3.1 2235.43,2310 R11.2 2260.55,2314.02 2335.31,2314.02 R12.1
NetC8_2: C8.2 R9.1 U2.4 | length 185.5
  Top Layer w10: R9.1@530.02,1475.45 C8.2@530.02,1559.55 ; C8.2 U2.4@530.47,1646.18
  Top Layer w20: R9.1 R9.1@530.02,1475.45 ; C8.2@530.02,1559.55 C8.2 ; U2.4@530.47,1646.18 533.27,1648.98 U2.4
NetC13_2: C13.2 D9.3 R21.1 | length 176.9
  Top Layer w10: C13.2 382.76,1314.2 R21.1 435.43,1322.64 463.07,1295 D9.3
NetC14_2: C14.2 D9.1 Q4.1 Q5.3 Q6.1 R22.2 | length 732.8
  Top Layer w10: Q6.1 C14.2 R22.2 279.88,1125.75 466.97,1125.75 Q5.3 473.15,1146.38 542.43,1215.66 542.43,1250.98 549.05,1257.6 D9.1 565.55,1264.21 591.42,1264.21 660.67,1333.46 Q4.1
NetC26_1: C26.1 U4.1 | length 131.4
  Top Layer w20: U4.1 2765,1555.32 2776.72,1567.03 2819.92,1567.03 C26.1
NetC26_2: C26.2 L5.1 U4.8 | length 297.3
  Top Layer w20: C26.2 2906.73,1567.03 2940.69,1567.03 2961.65,1546.06 U4.8
  Top Layer w40: U4.8 3062.32,1495 3070.47,1503.15 L5.1
NetD1_1: D1.1 D1.2 T1.8 T1.9 | length 383.3
  Top Layer w80: T1.9 T1.8 D1.2 D1.1
NetD3_C: D3.C T1.6 | length 148.7
  Top Layer w60: T1.6 2264.39,763.17 2264.39,616.18 D3.C
NetD4_C: D4.C R7.2 | length 90.1
  Top Layer w20: R7.2 1766.18,2070.75 1840.63,2070.75 1845,2075.12 D4.C
NetD7_1: D7.1 R19.2 | length 126.8
  Top Layer w10: D7.1 627.83,2252.34 667.2,2291.71 R19.2
NetD8_3: D8.3 R24.2 | length 91.9
  Top Layer w15: D8.3 695,608.15 720.73,633.88 720.73,681.59 R24.2
NetD10_A: D10.A Q1.EMITTER | length 110.4
  Top Layer w20: D10.A 957.01,827.72 957.01,924.88 Q1.EMITTER
  Top Layer w40: Q1.EMITTER@954.29,927.28 954.61,927.6 Q1.EMITTER
NetF1_1: F1.1 J1.1 | length 273.4
  Top Layer w60: J1.1 F1.1
NetM1_4: M1.4 R2.2 | length 106.9
  Top Layer w20: R2.2 1165.43,1659.76 1175.12,1669.45 1263.35,1669.45 M1.4
NetQ1_COLLECTOR: Q1.COLLECTOR R16.1 | length 99.1
  Top Layer w10: Q1.COLLECTOR Q1.COLLECTOR@1061.02,950.31
  Top Layer w30: Q1.COLLECTOR R16.1
NetQ3_1: Q3.1 R19.1 R20.2 | length 168.4
  Top Layer w10: Q3.1 528.17,2347.03 R20.2 R19.1
NetQ4_3: Q4.3 Q5.1 R23.1 | length 463.5
  Top Layer w10: Q5.1 678.94,1082.17 R23.1 765.35,1084.57 805,1124.21 805,1275 783.94,1296.06 Q4.3
NetQ7_1: Q7.1 R24.1 R25.1 R28.1 | length 539.7
  Top Layer w15: R28.1 200.51,600.43 R25.1 544.88,602.05 Q7.1 640.87,672.6 R24.1
NetQ7_3: Q7.3 R26.2 R27.1 | length 168.8
  Top Layer w15: R26.2 380.43,770.67 R27.1 390.43,710 Q7.3
NetQ8_1: Q8.1 R27.2 | length 99.2
  Top Layer w15: Q8.1 303.58,694.02 R27.2
PGND: C1.2 C5.1 C6.1 C7.1 C8.1 C9.1 C11.1 C13.1 C14.1 C15.1 C16.1 C17.1 C18.1 C21.1 D5.1 J1.2 Q2.3 Q3.2 Q4.2 Q6.2 Q7.2 Q8.2 R3.1 R20.1 R22.1 R25.2 T1.3 U2.2 U2.5 U3.3 | length 1786.1
  Top Layer w20: C14.1 179.23,1067.93 179.23,1015.77 v1(180,1015) ; Q8.2 225.42,768.82 227.03,770.43 227.03,814.23 v1(227.8,815) ; Q6.2 252.4,1236.31 254.02,1234.7 280.3,1234.7 v1(310,1205) 339.7,1175.3 381.98,1175.3 C13.1 ; v1(265.2,1015) R22.1 ; v2(280,2169.66) 282.5,2167.16 282.5,2034.9 C11.1 296.61,2044.02 403.19,2044.02 405,2045.83 Q2.3 ; v1(324.37,1698.98) 324.81,1698.53 382.12,1698.53 C9.1 ; v1(324.37,1791.34) 325.14,1792.1 380.2,1792.1 C6.1 ; v1(405,2260) 405.77,2259.23 451.98,2259.23 Q3.2 ; v1(405,2352.09) 405.24,2351.85 452.48,2351.85 R20.1 ; v1(543.27,480) R25.2 ; U2.2 543.65,1748.59 609.89,1748.59 v1(610.28,1748.21) ; Q7.2 547.62,747.4 549.23,749.02 549.23,797.98 v1(550,798.74) ; C8.1 612.99,1571.65 612.99,1602.62 625,1614.63 v1(625,1615.71) ; v1(658.7,1215) 659.47,1215.77 659.47,1257.05 661.08,1258.66 Q4.2 ; v1(718.74,1995) 719.37,1994.37 719.37,1946.06 C7.1 ; v1(726.69,835) 727.46,835.77 775.98,835.77 777.6,837.38 D5.1 ; U2.5 v1(820,1648.98) ; C21.1 930.04,1765.16 976.27,1765.16 v1(977.03,1765.93) ; v1(1715,2412.01) 1715.77,2411.24 1773.72,2411.24 U3.3 ; v1(1885,625) v1(1885,665) 1885,739.33 T1.3
  Top Layer w60: J1.2 v1(430,140) ; C1.2@933.9,95 943.27,104.37 C1.2
  other v1: 876.81,45 1010,45 876.81,105 1010,105 1245,420 1325,420 1415,420 1478.5,420 1575,420 1645,420 1755,420 1815,420 840,2035.63 890,2036.1 940,2036.1 1067.01,2040 1131.34,2040 1190,2040
RCZ: C10.2 R15.1 | length 85
  Top Layer w10: C10.2 R15.1
RT5: R30.2 U4.4 | length 90.3
  Top Layer w10: R30.2 2764.69,1275.55 2764.69,1344.69 U4.4
SGND: C3.2 C4.1 C19.1 C20.1 C22.1 C23.1 C24.1 C25.1 C27.1 C28.1 J2.2 R14.1 R18.1 R30.1 R32.2 R34.1 T1.4 T1.5 T1.7 U1.3 U4.7 U4.9 | length 2447.4
  Top Layer w20: U1.3 2453.75,2425 2455.36,2423.39 2455.36,2388.89 v1(2456.65,2387.6) ; R14.1 2531.67,2229.7 2531.67,2180.59 v1(2531.97,2180.29) ; R34.1 2665.24,1225.87 2694.76,1196.34 2743.66,1196.34 R30.1 v1(2750,1134.69) ; C4.1 3285.45,440.57 J2.2 ; v1(2830.51,1135) R32.2 ; v1(2892.36,1423.34) 2892.36,1432.6 2904.76,1445 U4.7 ; R18.1 2964.53,2215.77 3014.2,2215.77 v1(3014.96,2215) ; v1(3095,1130) 3095.77,1130.77 3095.77,1186.2 C27.1 ; C28.1 v1(3200,1365)
  Top Layer w30: T1.5 T1.5@2160,749.45 ; v1(2159.45,605) v1(2110,605) v1(2060,605) v1(2060,655) v1(2110,655) v1(2160,655) ; v1(2470,1865) v1(2517.6,1865) 2518.19,1865.59 v1(2567.76,1865.59) ; v1(2613.78,1865) v1(2664.7,1865)
  Top Layer w40: v1(2160,655) T1.5@2160,749.45
  Top Layer w60: T1.4 T1.5 ; T1.7 2482.45,1795.28 ; C19.1 v1(2517.6,1865) 2517.6,1830.42 2482.45,1795.28 ; C20.1 2664.7,1925.14 v1(2664.7,1865) 2664.7,1830.42 v1(2629.56,1795.28) v1(2510,1795.28) 2482.45,1795.28
  other v1: 2875,400 2875,439.57 2875,480 2835,1375 2892.36,1375.71 2490,1395 2835,1420 2490,1438.82 3500,1445 2835,1465 2892.36,1465 2488.61,1485 3500,1490 3500,1535 2490,1540 2488.61,1579.25 3500,1590 2488.61,1620 3500,1630.71 3500,1675 3245,1917.76 3245,1960.43 3245,2000.2
SN: C2.1 D2.1 R1.1 R29.1 | length 565.5
  Top Layer w40: R1.1 R29.1 1152.52,2144.25 D2.1@1379.47,2144.25 ; C2.1 1324.32,2237.91 1392.91,2169.32 1392.91,2157.69 D2.1@1379.47,2144.25 ; D2.1@1380.06,2144.25 D2.1@1379.47,2144.25
SS: C11.2 Q2.1 Q8.3 R17.1 R28.2 | length 1578.8
  Top Layer w10: R28.2 129.76,619.68 Q8.3 125,736.18 v2(125,850.43) ; v2(125,1866.69) 125,1924.88 160.55,1960.43 R17.1 283.9,1960.43 C11.2 285.39,1961.93 Q2.1
  Signal w10: v2(125,850.43) v2(125,1866.69)
SSX: C12.1 D6.A R18.2 | length 208.1
  Top Layer w10: D6.A 2846.85,2280 C12.1 2961.28,2288.46 R18.2
VAUX: C5.2 C21.2 D7.3 D10.C R7.1 TP7.TP U2.7 | length 3007.8
  Top Layer w20: D7.3 708.54,2216.32 785,2139.86 785,1934.92 C5.2@862.01,1857.91 ; U2.7 759.53,1751.77 845.79,1751.77 C21.2 854.45,1850.35 C5.2@862.01,1857.91 ; v2(1000,1884.06) 996.17,1880.23 900.23,1880.23 C5.2 ; D10.C v2(1205,825) ; v1(1205,1372.72) 1349.1,1372.72 1356.82,1365 TP7.TP ; v2(1515,2065) R7.1 ; C5.2@862.01,1857.91 873.98,1869.88 C5.2 ; C5.2@862.01,1857.91 869.96,1849.96 C5.2
  Signal w20: v2(1205,825) v1(1205,1372.72) 1205,1679.06 v2(1000,1884.06) 1334.06,1884.06 v2(1515,2065)
VIN: C1.1 C2.2 C15.2 C16.2 C17.2 C18.2 D8.1 D8.2 F1.2 R1.2 R6.2 R16.2 R29.2 T1.1 T1.2 TP3.TP | length 4963.1
  Top Layer w30: F1.2@668.5,347.5 657.6,358.4 D8.1 D8.2
  Top Layer w40: R6.2 1180,1084.57 1238.8,1025.77 R16.2 1238.8,955.16 1362.83,831.13 v2(1362.83,765) v2(1362.83,695)
  Top Layer w60: F1.2@668.5,347.5 684,363 933.9,363 C1.1@943.27,372.37 ; R1.2 R29.2 1268.86,2381.14 C2.2 1298.39,2351.61 TP3.TP@1502.07,2351.61 ; TP3.TP TP3.TP
  Top Layer w80: C1.1@943.27,372.37 C1.1 943.27,429.69 1105.72,592.14 1279.79,592.14 C15.2 C16.2 ; v2(1439.32,694.02) 1439.32,601.38 C16.2 ; T1.1 1677.52,759.49 1677.52,595.67 1680,593.19 ; T1.2 1787.05,759.49 1787.05,599.4 C18.2 1680,593.19 ; C16.2 C17.2 1680,593.19
  Signal w40: v2@1362.83,694.02 v2(1362.83,695)
  Signal w80: v2@1362.83,694.02 v2(1439.32,694.02) 1439.32,805.81 1620,986.5 1620,2237.13 TP3.TP
VREF: C7.2 R8.2 R9.2 R17.2 R26.1 U2.8 VREF.TP | length 2862.8
  Top Layer w15: VREF.TP@190.2,2295.2 v2(190.2,2095) 190.2,2036.1 R17.2 ; v2(221.57,1855) 221.57,1613.43 v2(300,1535) ; R26.1 v2(371.54,921.7) ; v2(598.46,2095) 601.42,2092.05 601.42,1883.18 610.03,1874.57 C7.2 734.15,1860.41 734.15,1804.27 U2.8@739.45,1798.98 ; R9.2 650,1475 677.64,1502.64 677.64,1775.14 701.48,1798.98 U2.8@739.45,1798.98 ; U2.8 U2.8@739.45,1798.98
  Signal w15: v2(221.57,1855) 221.57,2063.62 v2(190.2,2095) v2(598.46,2095) ; v2(300,1535) 371.54,1463.46 v2(371.54,921.7)
ZB: D5.3 Q1.BASE Q5.2 R6.1 R23.2 | length 748.2
  Top Layer w10: Q5.2 679.8,1156.97 R23.2 682.87,1156.97 v2(755,1156.97) ; D5.3 815,969.53 v2(855.47,1010) ; R6.1 930.04,1084.57 v2(855.47,1010) ; Q1.BASE 952.13,1010 v2(855.47,1010)
  Signal w10: v2(755,1156.97) 808.03,1156.97 854.45,1110.55 v2@854.45,1010
pads on no net: D5.2 D7.2 D9.2

## Polygon pours and split planes (outlines as drawn)
PGND on GND "PGND_L2" (solid, remove dead copper, pour order 4): 19.68,19.68 25,25 1909.45,25 1909.45,2540 1908.82,2539.37 19.68,2539.37
SGND on GND "SGND_L2" (solid, remove dead copper, pour order 8): 2027.56,25 3518.31,25 3523.62,19.68 3525,21.06 3525,2540 2028.19,2540 2027.56,2539.37
PGND on GND "PGND_L2" (solid, remove dead copper, pour order 6): -95,1965
no net on GND "GND-No Net" (solid, pour order 0): 10,2550
PGND on Top Layer "PGND_L2" (solid, remove dead copper, pour order 12): 5,2550 5,10 1905,10 1905,2550
VIN on Top Layer "PGND_L2" (solid, remove dead copper, pour order 18): 1315,785 1330,800 1339.77,809.76 1340.28,809.25 1471.64,809.25 1489.75,791.14 1489.75,643.41 1462.52,616.18 1453.65,625.04 1335.51,625.04 1315,645.55
SGND on Top Layer "SGND_L2" (solid, remove dead copper, pour order 10): 2041.34,2545 2040,2543.66 2040,15 3529.88,15 3530,15.12 3530,2545
VIN on Signal "VIN" (solid, remove dead copper, pour order 22): 1303.25,776.98

## Other copper
Top Layer:
  rectangle net PGND: 845,25 1046.34,135
  rectangle net SGND: 2470,1524.13 2575,1641.93
  rectangle net SGND: 2466.57,1375.71 2575,1503.15
  rectangle net PGND: 822.95,1970 954.84,2050
  rectangle net PGND: 1050,1950 1215,2060.83
  rectangle net SGND: 3415,1567.03 3520,1700
  rectangle net SGND: 3410,1420 3520,1555.32
  rectangle net PGND: 1215.88,400 1345.8,515
  rectangle net PGND: 1382.55,400 1510,515
  rectangle net PGND: 1549.21,400 1677.52,515
  rectangle net PGND: 1715.88,400 1845,515
  rectangle net SGND: 2795,375 2898.76,500
  rectangle net SGND: 3178.31,1895 3265,2024.22
  rectangle net SGND: 2452.64,1810 2664.49,1885.51

## Silkscreen, mask and mechanical layers (free items; w line width, h text height)
Top Overlay:
  lines w10: 1909.45,10 1909.45,2550 ; 2027.56,10 2027.56,2550
  text "FLYBACK DC-DC CONV" at 35,2500 h30
  text "+5V" at 3095,885 h30 r90
  text "+12V" at 3095,670.7 h30 r90
  text "GND" at 3095,456.39 h30 r90
  text "VDC" at 15,380.35 h30 r270
  text "-12V" at 3095,242.09 h30 r90
  text "C4" at 2455,225 h30
  text "GND" at 15,175 h30 r270
  text "PRIMARY" at 1512.47,35 h50
  text "SECONDARY" at 2065,35 h50
Bottom Overlay:
  text "design by Atakan" at 70,2533.46 h30 r90
Mechanical 1:
  lines w10: 0,0 3543.31,0 3543.31,2559.06 0,2559.06
Mechanical 13:
  lines w3.94: 1909.45,0 1909.45,2559.06 ; 2027.56,0 2027.56,2559.06